# Altium PCB FSAE_Analog_to_CAN_Converter.PcbDoc
Units mm, origin at the board's own origin, x right, y up, seen from the top; angles counter-clockwise.
Board outline 152.4 x 101.6 mm, 20 copper layers (F.Cu, F.Mask, B.Cu, B.Mask, In1.Cu, F.SilkS, In2.Cu, B.SilkS, F.Adhes, B.Adhes, F.Paste, B.Paste, Dwgs.User, Cmts.User, Eco1.User, Eco2.User, Edge.Cuts, Margin, B.CrtYd, F.CrtYd); 32 components, 0 nets, 154 pads, 43 vias.
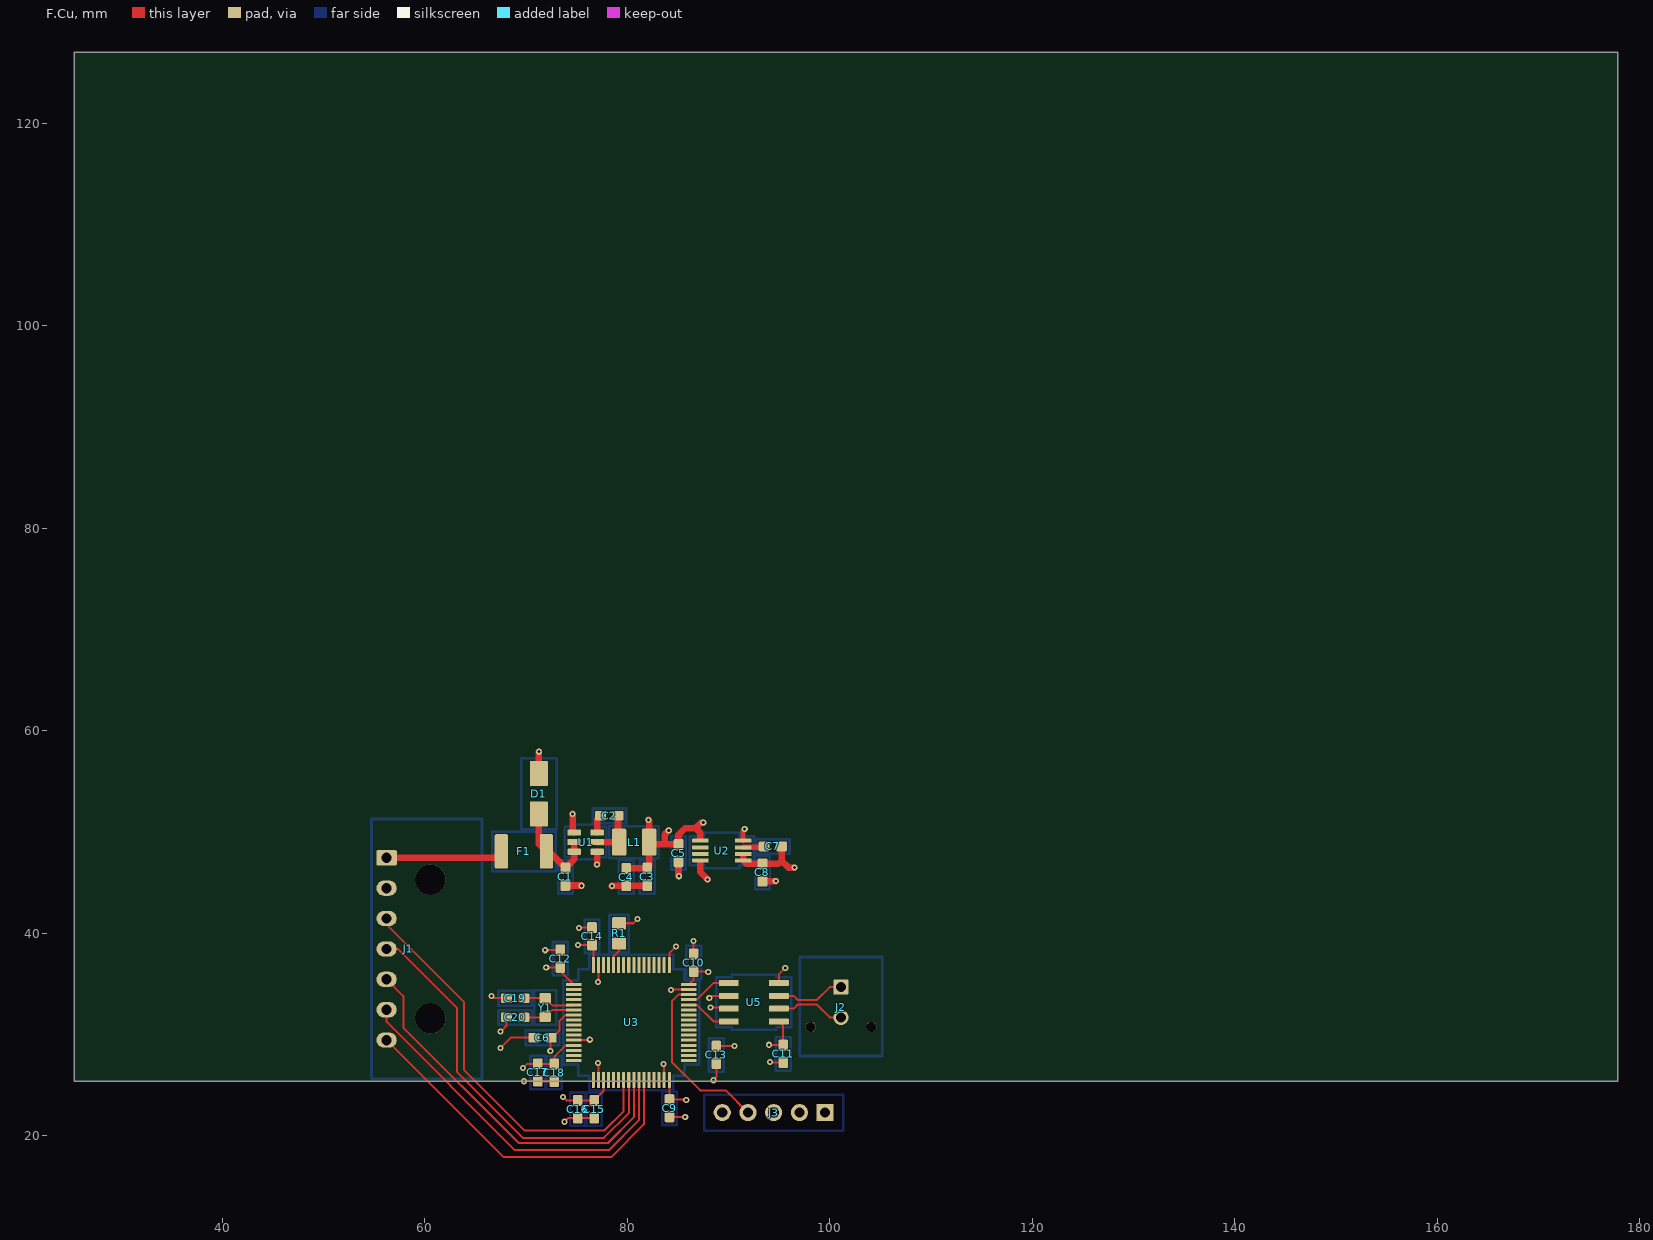
[diagram p0: F.Cu view]
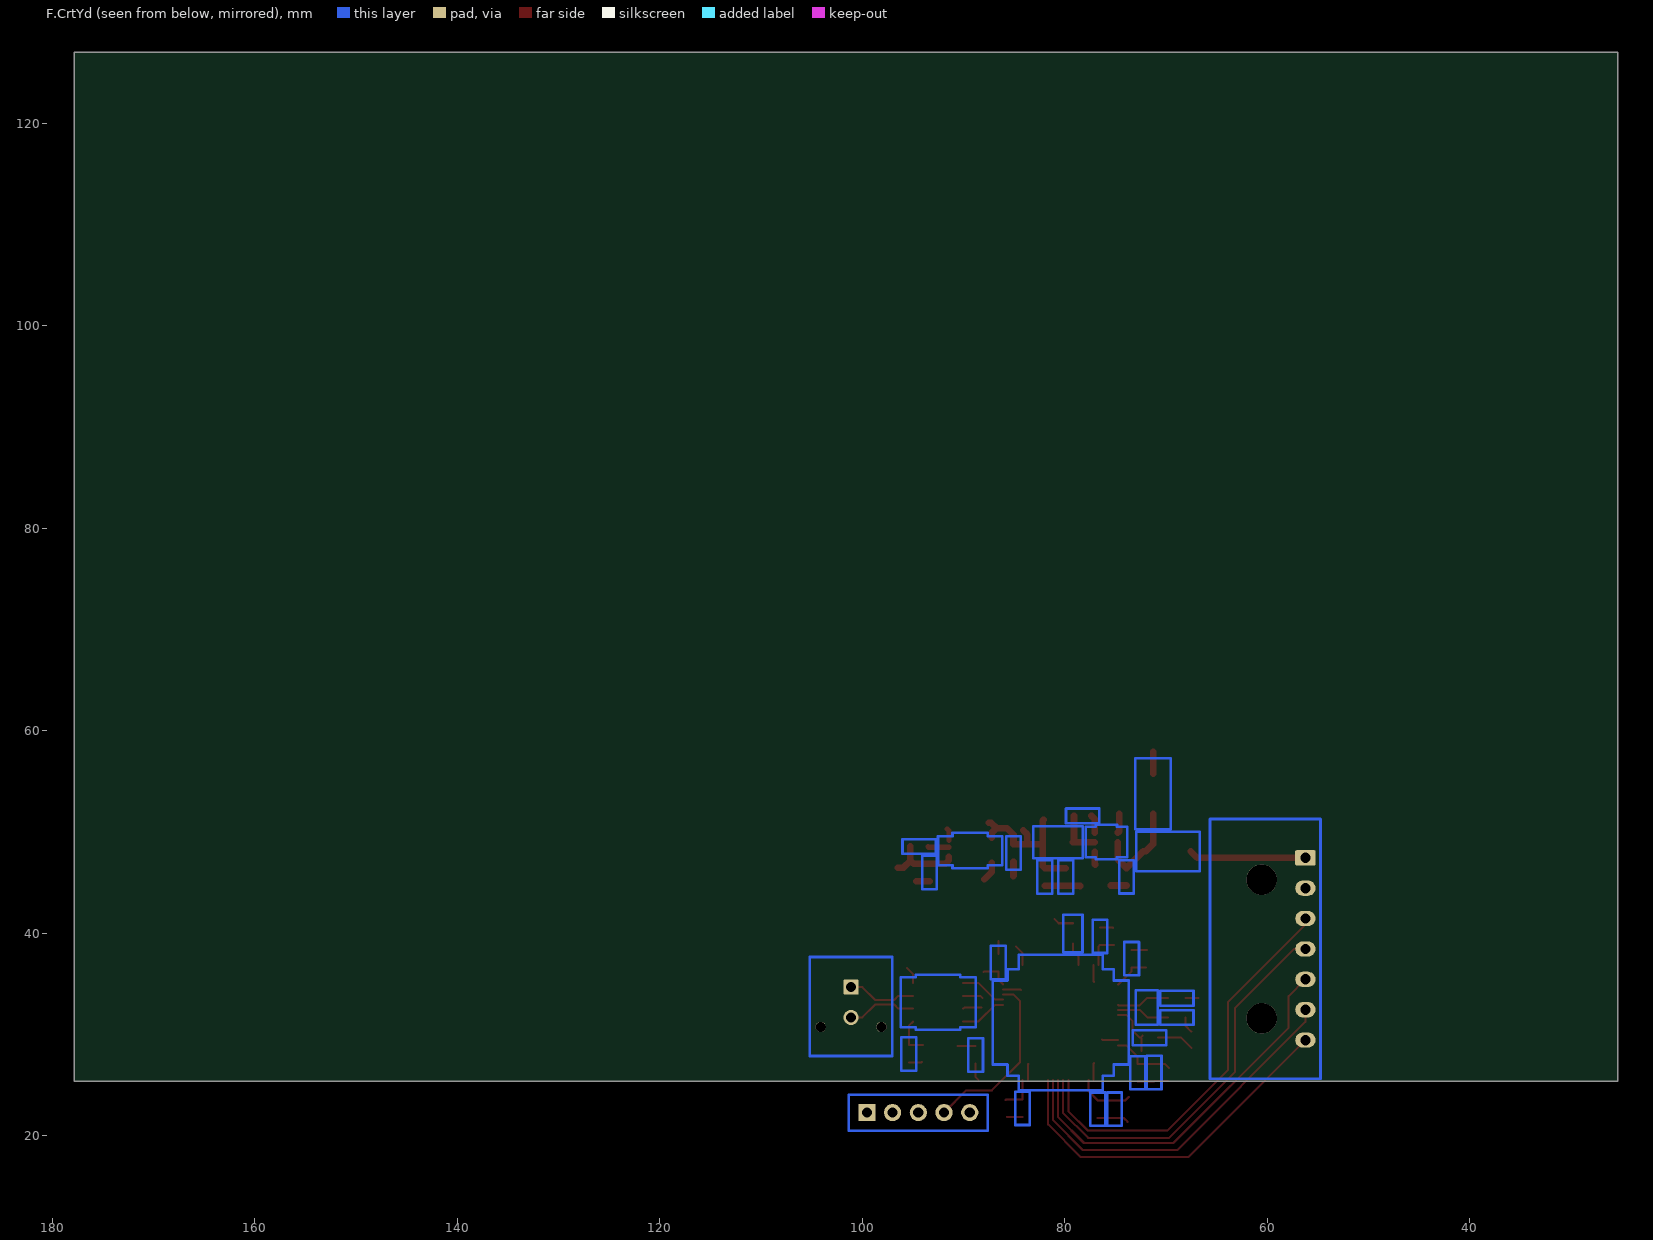
[diagram p1: F.CrtYd view, seen from below]
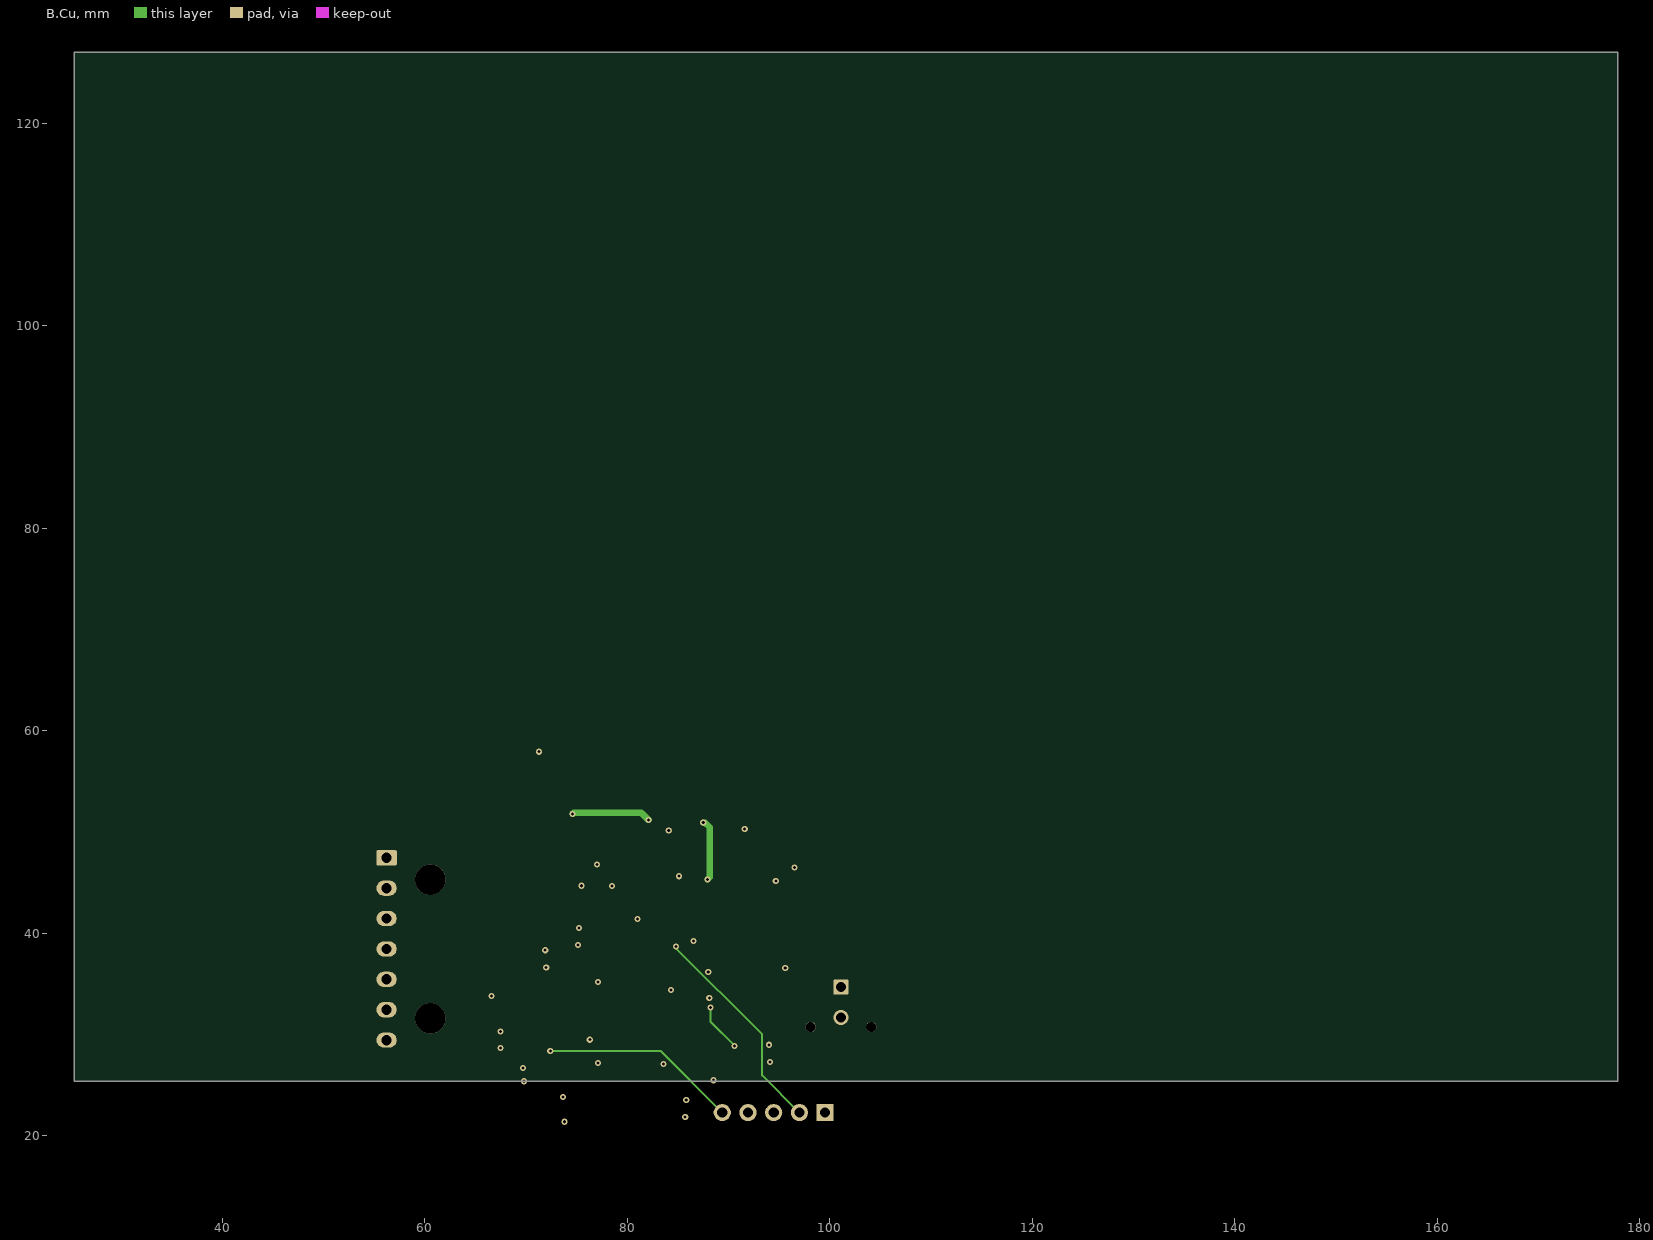
[diagram p2: B.Cu]
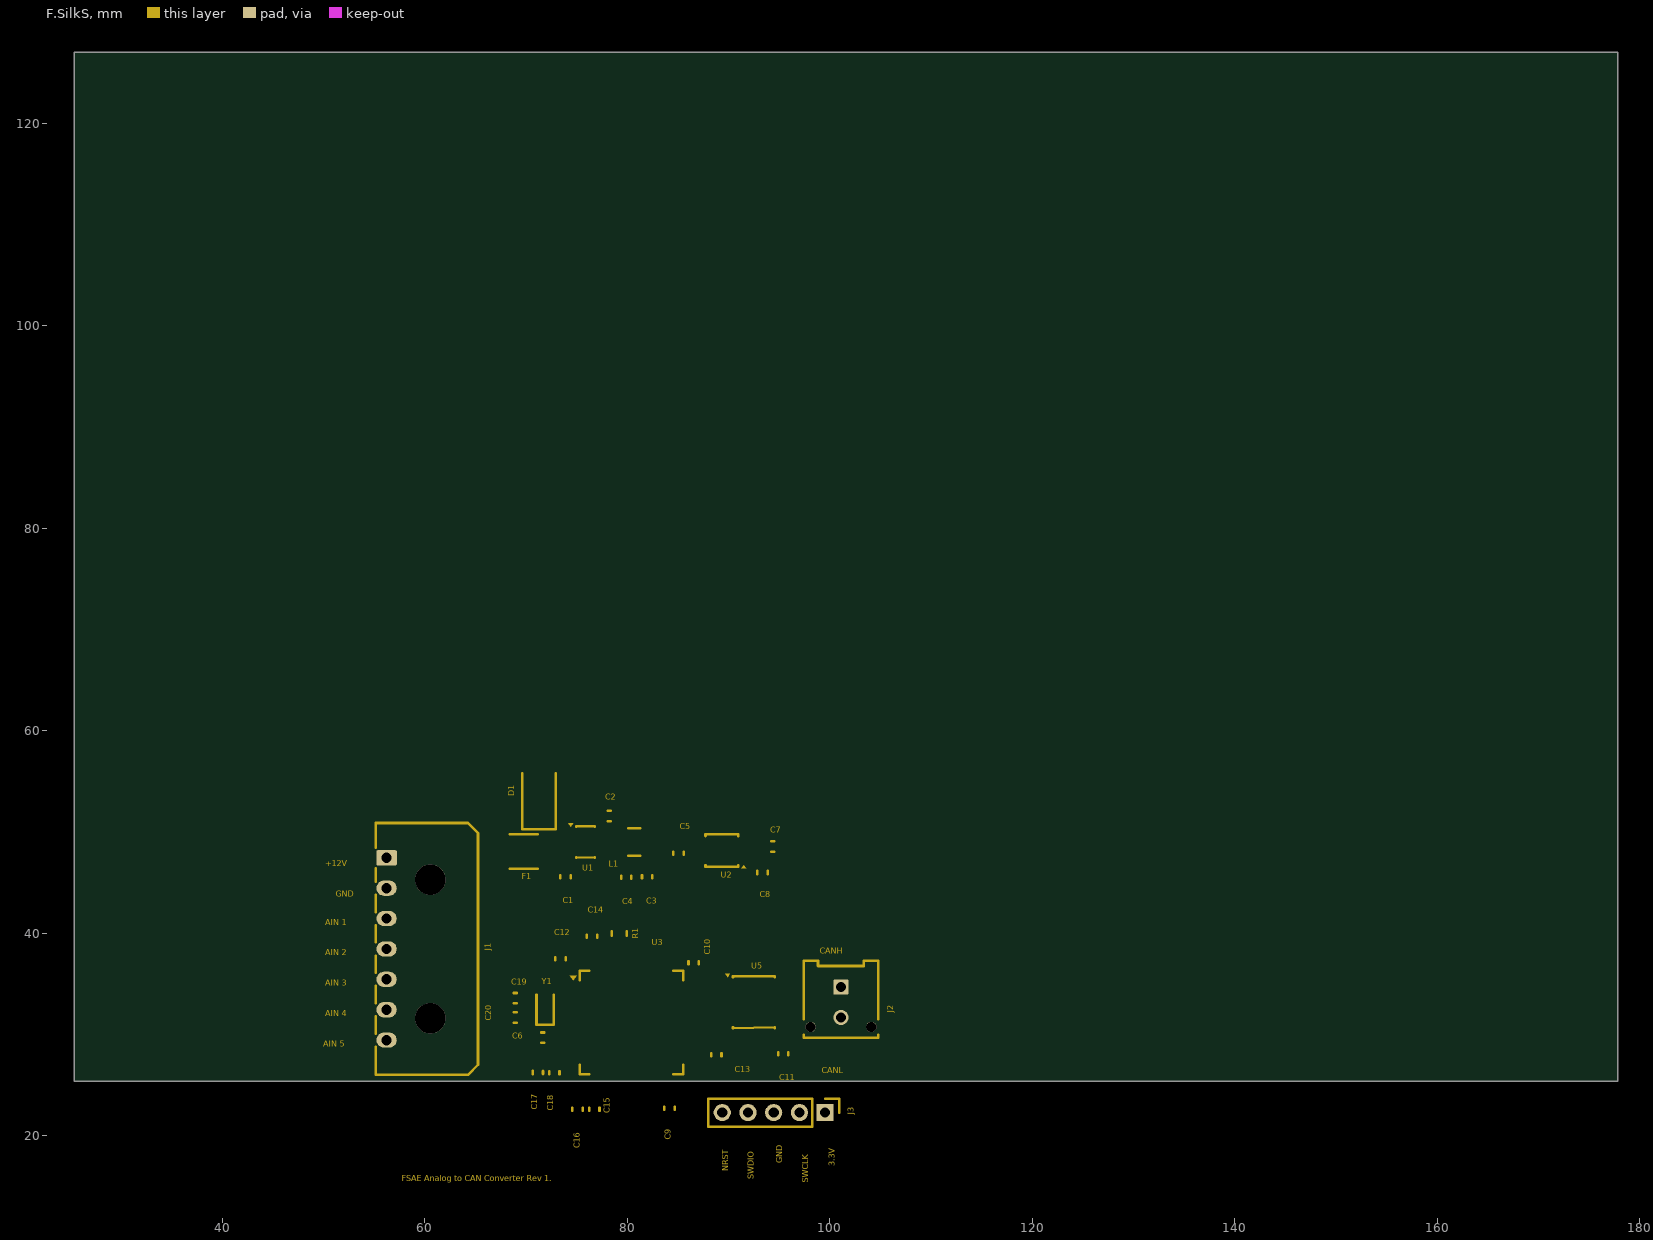
[diagram p3: F.SilkS]
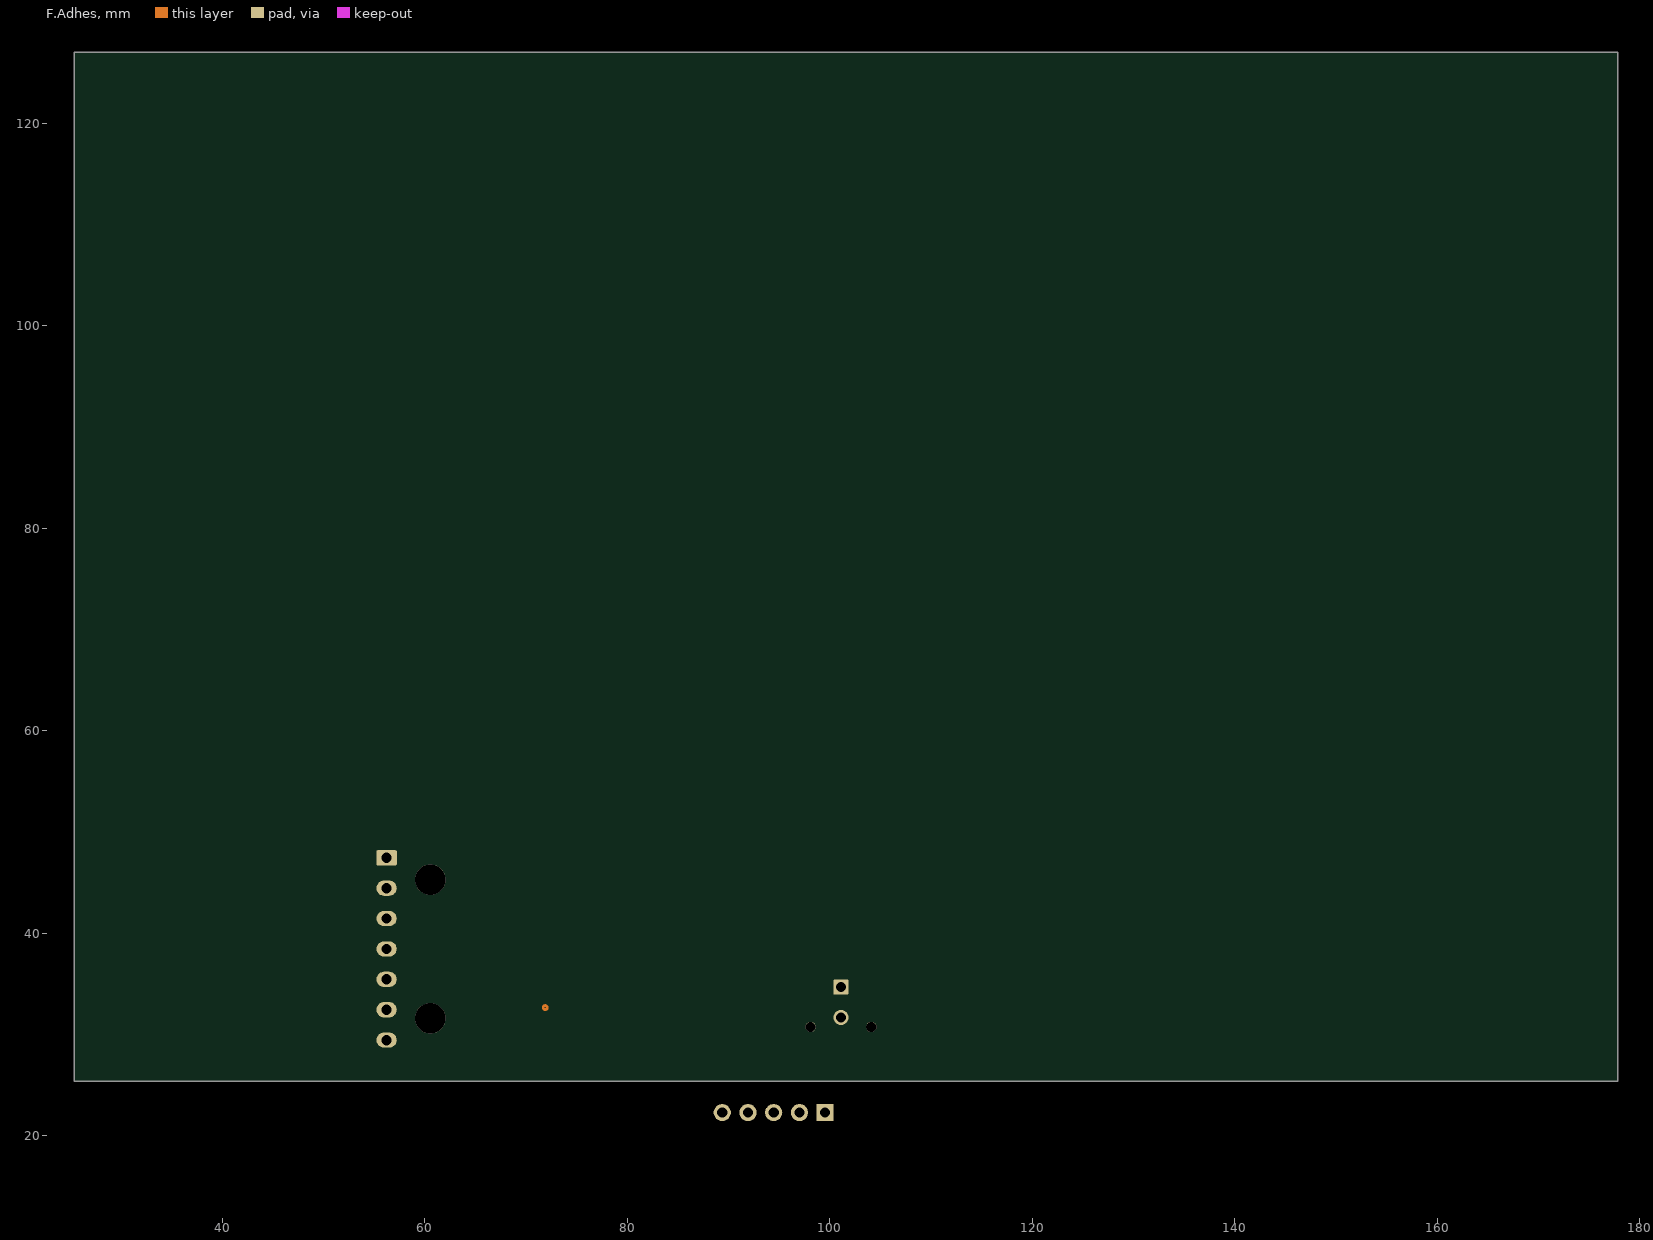
[diagram p4: F.Adhes]
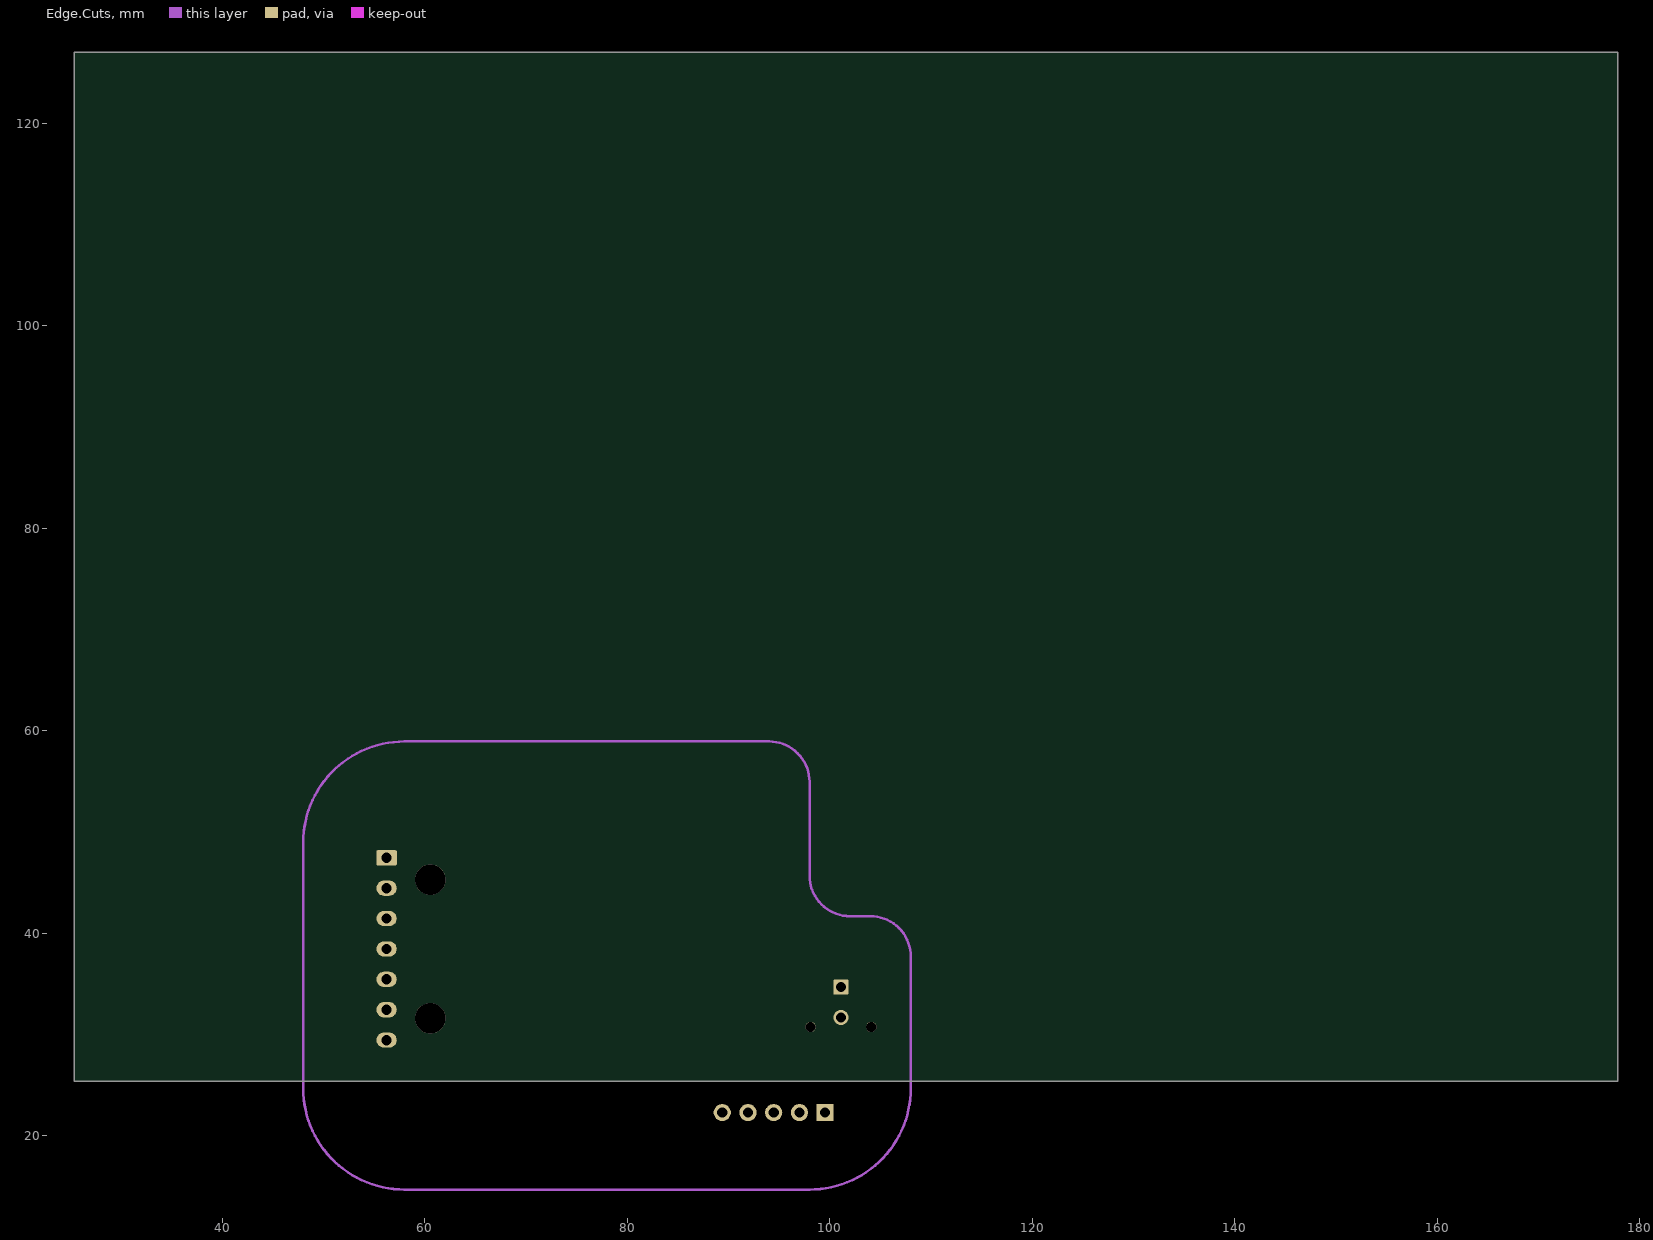
[diagram p5: Edge.Cuts]

## Layer stack, top to bottom
Top Solder: solder mask 0.0102, Solder Resist, Dk 3.5
F.Cu: signal copper 0.0356
Dielectric 1: dielectric 0.32, FR-4, Dk 4.8
F.Mask: signal copper 0.0356
Dielectric2: dielectric 0.32, FR-4, Dk 4.8
B.Cu: signal copper 0.0356
Dielectric3: dielectric 0.32, FR-4, Dk 4.8
B.Mask: signal copper 0.0356
Dielectric4: dielectric 0.32, FR-4, Dk 4.8
In1.Cu: signal copper 0.0356
Dielectric5: dielectric 0.32, FR-4, Dk 4.8
F.SilkS: signal copper 0.0356
Dielectric6: dielectric 0.32, FR-4, Dk 4.8
In2.Cu: signal copper 0.0356
Dielectric7: dielectric 0.32, FR-4, Dk 4.8
B.SilkS: signal copper 0.0356
Dielectric8: dielectric 0.32, FR-4, Dk 4.8
F.Adhes: signal copper 0.0356
Dielectric9: dielectric 0.32, FR-4, Dk 4.8
B.Adhes: signal copper 0.0356
Dielectric10: dielectric 0.32, FR-4, Dk 4.8
F.Paste: signal copper 0.0356
Dielectric11: dielectric 0.32, FR-4, Dk 4.8
B.Paste: signal copper 0.0356
Dielectric12: dielectric 0.32, FR-4, Dk 4.8
Dwgs.User: signal copper 0.0356
Dielectric13: dielectric 0.32, FR-4, Dk 4.8
Cmts.User: signal copper 0.0356
Dielectric14: dielectric 0.32, FR-4, Dk 4.8
Eco1.User: signal copper 0.0356
Dielectric15: dielectric 0.32, FR-4, Dk 4.8
Eco2.User: signal copper 0.0356
Dielectric16: dielectric 0.32, FR-4, Dk 4.8
Edge.Cuts: signal copper 0.0356
Dielectric17: dielectric 0.32, FR-4, Dk 4.8
Margin: signal copper 0.0356
Dielectric18: dielectric 0.32, FR-4, Dk 4.8
B.CrtYd: signal copper 0.0356
Dielectric19: dielectric 0.32, FR-4, Dk 4.8
F.CrtYd: signal copper 0.0356
Bottom Solder: solder mask 0.0102, Solder Resist, Dk 3.5

## Board outline
25.4,25.4 177.8,25.4 177.8,127 25.4,127

## Design rules (kind name [scope] priority, off if disabled: settings)
Clearance "Clearence 0.5_Polygon" [InNamedPolygon('In1.Cu-') OR InNamedPolygon('In2.Cu-') OR InNamedPolygon('In2.Cu--1')] p1: gap=0.5 ignorepadtopadclearanceinfootprint=FALSE
Clearance "Clearence 0.2_NetClass" [InNetClass('Default')] p2: gap=0.2 ignorepadtopadclearanceinfootprint=FALSE
MinimumSolderMaskSliver [All] p1: minsoldermaskwidth=0
PolygonConnect Polygon_In2.Cu--1_ConnectDirect [IsNamedPolygon('In2.Cu--1') vs IsVia] p1: connectstyle=Direct reliefconductorwidth=0.254 reliefentries=4 polygonreliefangle="90 Angle" airgapwidth=0.254
PolygonConnect Polygon_In2.Cu--1_ConnectRelief45 [IsNamedPolygon('In2.Cu--1') vs (IsThruPin or IsSMTPin) and (PadShape_AllLayers = 'Round')] p2: connectstyle=Relief reliefconductorwidth=0.5 reliefentries=4 polygonreliefangle="45 Angle" airgapwidth=0.5
PolygonConnect Polygon_In2.Cu--1_ConnectRelief90 [IsNamedPolygon('In2.Cu--1') vs (IsThruPin or IsSMTPin) and (PadShape_AllLayers <> 'Round')] p3: connectstyle=Relief reliefconductorwidth=0.5 reliefentries=4 polygonreliefangle="90 Angle" airgapwidth=0.5
PolygonConnect Polygon_In2.Cu-_ConnectDirect [IsNamedPolygon('In2.Cu-') vs IsVia] p4: connectstyle=Direct reliefconductorwidth=0.254 reliefentries=4 polygonreliefangle="90 Angle" airgapwidth=0.254
PolygonConnect Polygon_In2.Cu-_ConnectRelief45 [IsNamedPolygon('In2.Cu-') vs (IsThruPin or IsSMTPin) and (PadShape_AllLayers = 'Round')] p5: connectstyle=Relief reliefconductorwidth=0.5 reliefentries=4 polygonreliefangle="45 Angle" airgapwidth=0.5
PolygonConnect Polygon_In2.Cu-_ConnectRelief90 [IsNamedPolygon('In2.Cu-') vs (IsThruPin or IsSMTPin) and (PadShape_AllLayers <> 'Round')] p6: connectstyle=Relief reliefconductorwidth=0.5 reliefentries=4 polygonreliefangle="90 Angle" airgapwidth=0.5
PolygonConnect Polygon_In1.Cu-_ConnectDirect [IsNamedPolygon('In1.Cu-') vs IsVia] p7: connectstyle=Direct reliefconductorwidth=0.254 reliefentries=4 polygonreliefangle="90 Angle" airgapwidth=0.254
PolygonConnect Polygon_In1.Cu-_ConnectRelief45 [IsNamedPolygon('In1.Cu-') vs (IsThruPin or IsSMTPin) and (PadShape_AllLayers = 'Round')] p8: connectstyle=Relief reliefconductorwidth=0.5 reliefentries=4 polygonreliefangle="45 Angle" airgapwidth=0.5
PolygonConnect Polygon_In1.Cu-_ConnectRelief90 [IsNamedPolygon('In1.Cu-') vs (IsThruPin or IsSMTPin) and (PadShape_AllLayers <> 'Round')] p9: connectstyle=Relief reliefconductorwidth=0.5 reliefentries=4 polygonreliefangle="90 Angle" airgapwidth=0.5
RoutingVias [All] p1: holewidth=0.711 width=1.27 viastyle="Through Hole" minholewidth=0.711 minwidth=1.27 maxholewidth=0.711 maxwidth=1.27
SilkToSilkClearance [All] p1: silktosilkclearance=0
SilkToSolderMaskClearance [IsPad] p1: minsilkscreentomaskgap=0 clearancetoexposedcopper=TRUE
SolderMaskExpansion [All] p1: expansion=0 istentingtop=FALSE
Width [All] p1: maxlimit=10 minlimit=0.254 preferedwidth=0.254 toplayer_prefwidth=0.2 midlayer1_maxwidth=0.254 midlayer2_prefwidth=0.2 midlayer3_maxwidth=0.254 midlayer4_prefwidth=0.2 midlayer5_prefwidth=0.2 midlayer6_prefwidth=0.2 midlayer7_maxwidth=0.254 midlayer9_prefwidth=0.2 midlayer11_maxwidth=0.254 midlayer13_maxwidth=0.254 midlayer15_maxwidth=0.254 midlayer17_maxwidth=0.254 midlayer19_maxwidth=0.254 midlayer21_maxwidth=0.254 midlayer23_maxwidth=0.254 midlayer25_prefwidth=0.2 midlayer27_maxwidth=0.254 midlayer29_maxwidth=0.254 bottomlayer_prefwidth=0.2 minimp=50.000000 maximp=50.000000 favimp=50.000000
27 further rules are at their usual default settings.

## Components (designator, comment, footprint, x,y, rotation, side; value= is the part's Value field where it differs from the comment)
C1 "Comment" C_0603_1608Metric_Pad1.08x0.95mm_HandSolder 73.9,45.587 r270 top value=10uF
C2 "Comment" C_0603_1608Metric_Pad1.08x0.95mm_HandSolder 78.225,51.602 r180 top value=100nF
C3 "Comment" C_0603_1608Metric_Pad1.08x0.95mm_HandSolder 81.97,45.582 r270 top value=22uF
C4 "Comment" C_0603_1608Metric_Pad1.08x0.95mm_HandSolder 79.9,45.562 r270 top value=22uF
C5 "Comment" C_0603_1608Metric_Pad1.08x0.95mm_HandSolder 85.065,47.929 r270 top value=1uF
C6 "Comment" C_0603_1608Metric_Pad1.08x0.95mm_HandSolder 71.637,29.7 r0 top value=0.1uF
C7 "Comment" C_0603_1608Metric_Pad1.08x0.95mm_HandSolder 94.375,48.582 r0 top value=0.01uF
C8 "Comment" C_0603_1608Metric_Pad1.08x0.95mm_HandSolder 93.355,46.012 r90 top value=10uF
C9 "Comment" C_0603_1608Metric_Pad1.08x0.95mm_HandSolder 84.173,22.73 r270 top value=100nF
C10 "Comment" C_0603_1608Metric_Pad1.08x0.95mm_HandSolder 86.56,37.108 r90 top value=100nF
C11 "Comment" C_0603_1608Metric_Pad1.08x0.95mm_HandSolder 95.4,28.1 r90 top value=100nF
C12 "Comment" C_0603_1608Metric_Pad1.08x0.95mm_HandSolder 73.4,37.5 r90 top value=100nF
C13 "Comment" C_0603_1608Metric_Pad1.08x0.95mm_HandSolder 88.8,28 r90 top value=100nF
C14 "Comment" C_0603_1608Metric_Pad1.08x0.95mm_HandSolder 76.525,39.712 r90 top value=100nF
C15 "Comment" C_0603_1608Metric_Pad1.08x0.95mm_HandSolder 76.751,22.637 r270 top value=100nF
C16 "Comment" C_0603_1608Metric_Pad1.08x0.95mm_HandSolder 75.1,22.635 r270 top value=4.7uF
C17 "Comment" C_0603_1608Metric_Pad1.08x0.95mm_HandSolder 71.174,26.262 r270 top value=10nF
C18 "Comment" C_0603_1608Metric_Pad1.08x0.95mm_HandSolder 72.8,26.237 r270 top value=1uF
C19 "Comment" C_0603_1608Metric_Pad1.08x0.95mm_HandSolder 68.937,33.6 r0 top value=10pF
C20 "Comment" C_0603_1608Metric_Pad1.08x0.95mm_HandSolder 68.937,31.7 r0 top value=10pF
D1 "Comment" D_SMA 71.28,53.79 r90 top value=SMAJ16A
F1 "Comment" Fuse_1812_4532Metric_Pad1.30x3.40mm_HandSolder 69.79,48.09 r180 top value=Polyfuse
J1 "Comment" Molex_Micro-Fit_3.0_43650-0700_1x07_P3.00mm_Horizontal 56.236,47.462 r270 top value=Conn_01x07_Pin
J2 "Comment" Molex_Micro-Fit_3.0_43045-0212_2x01_P3.00mm_Vertical 101.1,34.7 r0 top value=Conn_01x02_Pin
J3 "Comment" PinHeader_1x05_P2.54mm_Vertical 99.54,22.3 r270 top value=Conn_01x05
L1 "Comment" L_1210_3225Metric_Pad1.42x2.65mm_HandSolder 80.68,49.01 r0 top value=10uH
R1 "Comment" R_0805_2012Metric_Pad1.20x1.40mm_HandSolder 79.2,40 r90 top value=10k
U1 "Comment" TSOT-23-6 75.888,49.01 r0 top value=AP63205WU
U2 "Comment" MSOP-8_3x3mm_P0.65mm 89.337,48.177 r180 top value=LT1962-3.3
U3 "Comment" LQFP-64_10x10mm_P0.5mm 80.4,31.2 r0 top value=STM32F103RCTx
U5 "Comment" SOIC-8_3.9x4.9mm_P1.27mm 92.5,33.2 r0 top value=MCP2562-E-SN
Y1 "Comment" Crystal_SMD_2012-2Pin_2.0x1.2mm_HandSoldering 71.9,32.675 r90 top value=8MHz

## Footprints (in the part's own frame and the unit in brackets; to place one, negate y for a bottom-side part, rotate by r counter-clockwise, add the part's x,y. Pads: shape width x height; smd on the part's side, far side on the other; paste and mask are expansions set on the pad)
C_0603_1608Metric_Pad1.08x0.95mm_HandSolder [mm]
  rrect25% 1.075x0.95 smd paste-1.075 mask-1.075: 1(-0.863,0) 2(0.863,0)
  F.SilkS lines w0.254: 0.146,-0.51 -0.146,-0.51 ; 0.146,0.51 -0.146,0.51
  F.CrtYd lines w0.254: 1.65,-0.73 1.65,0.73 -1.65,0.73 -1.65,-0.73 1.65,-0.73
Crystal_SMD_2012-2Pin_2.0x1.2mm_HandSoldering [mm]
  rrect24% 1.05x1.1 smd paste-1.1 mask-1.1: 1(-0.925,0) 2(0.925,0)
  F.SilkS lines w0.254: 1.26,0.86 -1.71,0.86 -1.71,-0.86 1.26,-0.86
  F.Adhes circle w0.254: c0,0 r0.2
  F.CrtYd lines w0.254: -1.71,1.1 1.71,1.1 1.71,-1.1 -1.71,-1.1 -1.71,1.1
D_SMA [mm]
  rrect14% 2.5x1.8 smd paste-2.5 mask-2.5: 1(-2,0) 2(2,0)
  F.SilkS lines w0.254: 2,1.65 -3.51,1.65 -3.51,-1.65 2,-1.65
  F.CrtYd lines w0.254: -3.5,1.75 -3.5,-1.75 3.5,-1.75 3.5,1.75 -3.5,1.75
Fuse_1812_4532Metric_Pad1.30x3.40mm_HandSolder [mm]
  rrect19% 1.3x3.4 smd paste-3.4 mask-3.4: 1(-2.225,0) 2(2.225,0)
  F.SilkS lines w0.254: 1.386,1.71 -1.386,1.71 ; 1.386,-1.71 -1.386,-1.71
  F.CrtYd lines w0.254: 3.13,1.95 -3.13,1.95 -3.13,-1.95 3.13,-1.95 3.13,1.95
L_1210_3225Metric_Pad1.42x2.65mm_HandSolder [mm]
  rrect18% 1.425x2.65 smd paste-2.65 mask-2.65: 1(-1.488,0) 2(1.488,0)
  F.SilkS lines w0.254: -0.602,-1.36 0.602,-1.36 ; -0.602,1.36 0.602,1.36
  F.CrtYd lines w0.254: -2.45,-1.58 2.45,-1.58 2.45,1.58 -2.45,1.58 -2.45,-1.58
LQFP-64_10x10mm_P0.5mm [mm]
  rrect25% 1.55x0.3 smd paste-1.55 mask-1.55: 1(-5.675,3.75) 2(-5.675,3.25) 3(-5.675,2.75) 4(-5.675,2.25) 5(-5.675,1.75) 6(-5.675,1.25) 7(-5.675,0.75) 8(-5.675,0.25) 9(-5.675,-0.25) 10(-5.675,-0.75) 11(-5.675,-1.25) 12(-5.675,-1.75) 13(-5.675,-2.25) 14(-5.675,-2.75) 15(-5.675,-3.25) 16(-5.675,-3.75) 33(5.675,-3.75) 34(5.675,-3.25) 35(5.675,-2.75) 36(5.675,-2.25) 37(5.675,-1.75) 38(5.675,-1.25) 39(5.675,-0.75) 40(5.675,-0.25) 41(5.675,0.25) 42(5.675,0.75) 43(5.675,1.25) 44(5.675,1.75) 45(5.675,2.25) 46(5.675,2.75) 47(5.675,3.25) 48(5.675,3.75)
  rrect25% 0.3x1.55 smd paste-1.55 mask-1.55: 17(-3.75,-5.675) 18(-3.25,-5.675) 19(-2.75,-5.675) 20(-2.25,-5.675) 21(-1.75,-5.675) 22(-1.25,-5.675) 23(-0.75,-5.675) 24(-0.25,-5.675) 25(0.25,-5.675) 26(0.75,-5.675) 27(1.25,-5.675) 28(1.75,-5.675) 29(2.25,-5.675) 30(2.75,-5.675) 31(3.25,-5.675) 32(3.75,-5.675) 49(3.75,5.675) 50(3.25,5.675) 51(2.75,5.675) 52(2.25,5.675) 53(1.75,5.675) 54(1.25,5.675) 55(0.75,5.675) 56(0.25,5.675) 57(-0.25,5.675) 58(-0.75,5.675) 59(-1.25,5.675) 60(-1.75,5.675) 61(-2.25,5.675) 62(-2.75,5.675) 63(-3.25,5.675) 64(-3.75,5.675)
  F.SilkS region: -5.75,4.16 -6.09,4.63 -5.41,4.63
  F.SilkS lines w0.254: -5.11,-4.16 -5.11,-5.11 -4.16,-5.11 ; -5.11,4.16 -5.11,5.11 -4.16,5.11 ; 4.16,-5.11 5.11,-5.11 5.11,-4.16 ; 4.16,5.11 5.11,5.11 5.11,4.16
  F.CrtYd lines w0.254: -6.7,-4.15 -6.7,4.15 -5.25,4.15 -5.25,5.25 -4.15,5.25 -4.15,6.7 4.15,6.7 4.15,5.25 5.25,5.25 5.25,4.15 6.7,4.15 6.7,-4.15 5.25,-4.15 5.25,-5.25 4.15,-5.25 4.15,-6.7 -4.15,-6.7 -4.15,-5.25 -5.25,-5.25 -5.25,-4.15 -6.7,-4.15
Molex_Micro-Fit_3.0_43045-0212_2x01_P3.00mm_Vertical [mm]
  rrect17% 1.5x1.5 hole 1.02 paste-2539.97 mask-1.5: 1(0,0)
  round 1.5 hole 1.02 paste-2539.97 mask-1.5: 2(0,-3)
  round 1.02 hole 1.02 paste-2539.97 mask-1.02: Un1(-3,-3.94) Un2(3,-3.94)
  F.SilkS lines w0.254: -3.685,-4.71 -3.685,-5.01 3.685,-5.01 3.685,-4.71 ; -3.685,-3.17 -3.685,2.58 -2.265,2.58 -2.265,2.08 2.265,2.08 2.265,2.58 3.685,2.58 3.685,-3.17
  F.CrtYd lines w0.254: -4.08,-6.81 4.08,-6.81 4.08,2.97 -4.08,2.97 -4.08,-6.81
Molex_Micro-Fit_3.0_43650-0700_1x07_P3.00mm_Horizontal [mm]
  rrect17% 1.5x2.02 hole 1.02 paste-2539.97 mask-2.02: 1(0,0)
  rrect100% 1.5x2.02 hole 1.02 paste-2539.97 mask-2.02: 2(3,0) 3(6,0) 4(9,0) 5(12,0) 6(15,0) 7(18,0)
  round 3 hole 3 paste-2539.97 mask-3: Un1(2.15,4.32) Un2(15.85,4.32)
  F.SilkS lines w0.254: 18.652,-1.09 21.435,-1.09 21.435,8.03 20.435,9.03 -2.435,9.03 -3.435,8.03 -3.435,-1.09 -1.01,-1.09 ; 17.348,-1.09 15.652,-1.09 ; 14.348,-1.09 12.652,-1.09 ; 11.348,-1.09 9.652,-1.09 ; 8.348,-1.09 6.652,-1.09 ; 5.348,-1.09 3.652,-1.09 ; 2.348,-1.09 1.01,-1.09
  F.CrtYd lines w0.254: 21.83,-1.49 21.83,9.42 -3.83,9.42 -3.83,-1.49 21.83,-1.49
MSOP-8_3x3mm_P0.65mm [mm]
  rrect25% 1.625x0.4 smd paste-1.625 mask-1.625: 1(-2.113,0.975) 2(-2.113,0.325) 3(-2.113,-0.325) 4(-2.113,-0.975) 5(2.113,-0.975) 6(2.113,-0.325) 7(2.113,0.325) 8(2.113,0.975)
  F.SilkS region: -2.16,1.44 -2.4,1.77 -1.92,1.77
  F.SilkS lines w0.254: 1.61,1.435 1.61,1.61 -1.61,1.61 -1.61,1.435 ; 1.61,-1.435 1.61,-1.61 -1.61,-1.61 -1.61,-1.435
  F.CrtYd lines w0.254: 3.18,1.43 3.18,-1.43 1.75,-1.43 1.75,-1.75 -1.75,-1.75 -1.75,-1.43 -3.18,-1.43 -3.18,1.43 -1.75,1.43 -1.75,1.75 1.75,1.75 1.75,1.43 3.18,1.43
PinHeader_1x05_P2.54mm_Vertical [mm]
  rect 1.7x1.7 hole 1 paste-2539.97 mask-1.7: 1(0,0)
  round 1.7 hole 1 paste-2539.97 mask-1.7: 2(0,-2.54) 3(0,-5.08) 4(0,-7.62) 5(0,-10.16)
  F.SilkS lines w0.254: -1.38,0 -1.38,1.38 0,1.38 ; 1.38,-11.54 1.38,-1.27 -1.38,-1.27 -1.38,-11.54 1.38,-11.54
  F.CrtYd lines w0.254: 1.77,-11.93 1.77,1.77 -1.77,1.77 -1.77,-11.93 1.77,-11.93
R_0805_2012Metric_Pad1.20x1.40mm_HandSolder [mm]
  rrect21% 1.2x1.4 smd paste-1.4 mask-1.4: 1(-1,0) 2(1,0)
  F.SilkS lines w0.254: -0.227,0.735 0.227,0.735 ; -0.227,-0.735 0.227,-0.735
  F.CrtYd lines w0.254: -1.85,0.95 1.85,0.95 1.85,-0.95 -1.85,-0.95 -1.85,0.95
SOIC-8_3.9x4.9mm_P1.27mm [mm]
  rrect25% 1.95x0.6 smd paste-1.95 mask-1.95: 1(-2.475,1.905) 2(-2.475,0.635) 3(-2.475,-0.635) 4(-2.475,-1.905) 5(2.475,-1.905) 6(2.475,-0.635) 7(2.475,0.635) 8(2.475,1.905)
  F.SilkS region: -2.6,2.47 -2.84,2.8 -2.36,2.8
  F.SilkS lines w0.254: -2.06,-2.465 -2.06,-2.56 2.06,-2.465 2.06,-2.56 ; -2.06,2.465 -2.06,2.56 2.06,2.56 2.06,2.465
  F.CrtYd lines w0.254: -3.7,-2.46 -3.7,2.46 -2.2,2.46 -2.2,2.7 2.2,2.7 2.2,2.46 3.7,2.46 3.7,-2.46 2.2,-2.46 2.2,-2.7 -2.2,-2.7 -2.2,-2.46 -3.7,-2.46
TSOT-23-6 [mm]
  rrect25% 1.325x0.6 smd paste-1.325 mask-1.325: 1(-1.138,0.95) 2(-1.138,0) 3(-1.138,-0.95) 4(1.138,-0.95) 5(1.138,0) 6(1.138,0.95)
  F.SilkS region: -1.45,1.51 -1.69,1.84 -1.21,1.84
  F.SilkS lines w0.254: -0.91,-1.51 -0.91,-1.56 0.91,-1.51 0.91,-1.56 ; -0.91,1.51 -0.91,1.56 0.91,1.56 0.91,1.51
  F.CrtYd lines w0.254: -2.05,-1.5 -2.05,1.5 -1.05,1.5 -1.05,1.7 1.05,1.7 1.05,1.5 2.05,1.5 2.05,-1.5 1.05,-1.5 1.05,-1.7 -1.05,-1.7 -1.05,-1.5 -2.05,-1.5

## Part data
C1 C2 C3 C4 C5 C6 C7 C8 C9 C10 C11 C12 C13 C14 C15 C16 C17 C18 C19 C20: library part C_0603_1608Metric_Pad1.08x0.95mm_HandSolder, "Capacitor SMD 0603 (1608 Metric), square (rectangular) end terminal, IPC-7351 nominal with elongated pad for handsoldering. (Body size source: IPC-SM-782 page 76, https://www.pcb-3d.com/wordpress/wp-content/uploads/ipc-sm-782a_amendment_1_and_2.pdf)", Description="Unpolarized capacitor", KiLib_Generator=SMD_2terminal_chip_molded, ki_fp_filters=C_*
D1: library part D_SMA, "Diode SMA (DO-214AC)", Datasheet=https://www.littelfuse.com/media?resourcetype=datasheets&itemid=75e32973-b177-4ee3-a0ff-cedaf1abdb93&filename=smaj-datasheet, Description="400W unidirectional Transient Voltage Suppressor, 16.0Vr, SMA(DO-214AC)", ki_fp_filters=D*SMA*
F1: library part Fuse_1812_4532Metric_Pad1.30x3.40mm_HandSolder, "Fuse SMD 1812 (4532 Metric), square (rectangular) end terminal, IPC-7351 nominal with elongated pad for handsoldering. (Body size source: https://www.nikhef.nl/pub/departments/mt/projects/detectorR_D/dtddice/ERJ2G.pdf)", Description="Resettable fuse, polymeric positive temperature coefficient", KiLib_Generator=SMD_2terminal_chip_molded, ki_fp_filters="*polyfuse* *PTC*"
J1: library part Molex_Micro-Fit_3.0_43650-0700_1x07_P3.00mm_Horizontal, "Molex Micro-Fit 3.0 Connector System, 43650-0700 (compatible alternatives: 43650-0701, 43650-0702), 7 Pins per row (https://www.molex.com/pdm_docs/sd/436500300_sd.pdf)", Description="Generic connector, single row, 01x07, script generated", KiLib_Generator=connector/Molex, ki_fp_filters=Connector*:*_1x??_*
J2: library part Molex_Micro-Fit_3.0_43045-0212_2x01_P3.00mm_Vertical, "Molex Micro-Fit 3.0 Connector System, 43045-0212 (compatible alternatives: 43045-0213, 43045-0214), 1 Pins per row (http://www.molex.com/pdm_docs/sd/430450212_sd.pdf)", Description="Generic connector, single row, 01x02, script generated", KiLib_Generator=connector/Molex, ki_fp_filters=Connector*:*_1x??_*
J3: library part PinHeader_1x05_P2.54mm_Vertical, "Through hole straight pin header, 1x05, 2.54mm pitch, single row", Description="Generic connector, single row, 01x05, script generated (kicad-library-utils/schlib/autogen/connector/)", KiLib_Generator=connector/pin_header_socket, ki_fp_filters=Connector*:*_1x??_*
L1: library part L_1210_3225Metric_Pad1.42x2.65mm_HandSolder, "Inductor SMD 1210 (3225 Metric), square (rectangular) end terminal, IPC-7351 nominal with elongated pad for handsoldering. (Body size source: http://www.tortai-tech.com/upload/download/2011102023233369053.pdf)", Description=Inductor, KiLib_Generator=SMD_2terminal_chip_molded, ki_fp_filters="Choke_* *Coil* Inductor_* L_*"
R1: library part R_0805_2012Metric_Pad1.20x1.40mm_HandSolder, "Resistor SMD 0805 (2012 Metric), square (rectangular) end terminal, IPC-7351 nominal with elongated pad for handsoldering. (Body size source: IPC-SM-782 page 72, https://www.pcb-3d.com/wordpress/wp-content/uploads/ipc-sm-782a_amendment_1_and_2.pdf)", Description=Resistor, KiLib_Generator=SMD_2terminal_chip_molded, ki_fp_filters=R_*
U1: library part TSOT-23-6, "TSOT, 6 Pin (https://www.jedec.org/sites/default/files/docs/MO-193D.pdf variant AA)", Datasheet=https://www.diodes.com/assets/Datasheets/AP63200-AP63201-AP63203-AP63205.pdf, Description="2A, 1.1MHz Buck DC/DC Converter, fixed 5.0V output voltage, TSOT-23-6", KiLib_Generator=package/gullwing, ki_fp_filters=TSOT?23*
U2: library part MSOP-8_3x3mm_P0.65mm, "MSOP, 8 Pin (https://www.jedec.org/system/files/docs/mo-187F.pdf variant AA)", Datasheet=https://www.analog.com/media/en/technical-documentation/data-sheets/1962fb.pdf, Description="3.3V, 300mA, Low Noise, Micropower LDO Regulator, MSOP-8", KiLib_Generator=package/gullwing, ki_fp_filters=MSOP*3x3mm*P0.65mm*
U3: library part LQFP-64_10x10mm_P0.5mm, "LQFP, 64 Pin (https://www.analog.com/media/en/technical-documentation/data-sheets/ad7606_7606-6_7606-4.pdf)", Datasheet=https://www.st.com/resource/en/datasheet/stm32f103rc.pdf, Description="STMicroelectronics Arm Cortex-M3 MCU, 256KB flash, 48KB RAM, 72 MHz, 2.0-3.6V, 51 GPIO, LQFP64", KiLib_Generator=package/gullwing, ki_fp_filters=LQFP*10x10mm*P0.5mm*
U5: library part SOIC-8_3.9x4.9mm_P1.27mm, "SOIC, 8 Pin (JEDEC MS-012AA, https://www.analog.com/media/en/package-pcb-resources/package/pkg_pdf/soic_narrow-r/r_8.pdf)", Datasheet=http://ww1.microchip.com/downloads/en/DeviceDoc/25167A.pdf, Description="High-Speed CAN Transceiver, 1Mbps, 5V supply, Vio pin, -40C to +125C, SOIC-8", KiLib_Generator=package/gullwing, ki_fp_filters=SOIC*3.9x4.9mm*P1.27mm*
Y1: library part Crystal_SMD_2012-2Pin_2.0x1.2mm_HandSoldering, "2012/2, Crystal, 2.0x1.2mm package, SMD, hand-soldering, http://txccrystal.com/images/pdf/9ht11.pdf", Description="Two pin crystal", KiLib_Generator=crystal_resonator_oscillator, ki_fp_filters=Crystal*

## Via types
v1: diameter 0.6, hole 0.3, F.Cu to B.Cu, tented both sides, 43 vias

## Nets (pads, with @x,y where several pads share a name; then routed paths per layer and width w, separated by ;. In a path a pad name is that pad's centre, name@x,y a point inside that pad or via, vN(x,y) a via of type N, cw(c..) or ccw(c..) an arc to the next point about the centre after c; other vN are vias at no path point)
pads on no net: C1.1 C1.2 C2.1 C2.2 C3.1 C3.2 C4.1 C4.2 C5.1 C5.2 C6.1 C6.2 C7.1 C7.2 C8.1 C8.2 C9.1 C9.2 C10.1 C10.2 C11.1 C11.2 C12.1 C12.2 C13.1 C13.2 C14.1 C14.2 C15.1 C15.2 C16.1 C16.2 C17.1 C17.2 C18.1 C18.2 C19.1 C19.2 C20.1 C20.2 D1.1 D1.2 F1.1 F1.2 J1.1 J1.2 J1.3 J1.4 J1.5 J1.6 J1.7 J1.Un1 J1.Un2 J2.1 J2.2 J2.Un1 J2.Un2 J3.1 J3.2 J3.3 J3.4 J3.5 L1.1 L1.2 R1.1 R1.2 U1.1 U1.2 U1.3 U1.4 U1.5 U1.6 U2.1 U2.2 U2.3 U2.4 U2.5 U2.6 U2.7 U2.8 U3.1 U3.2 U3.3 U3.4 U3.5 U3.6 U3.7 U3.8 U3.9 U3.10 U3.11 U3.12 U3.13 U3.14 U3.15 U3.16 U3.17 U3.18 U3.19 U3.20 U3.21 U3.22 U3.23 U3.24 U3.25 U3.26 U3.27 U3.28 U3.29 U3.30 U3.31 U3.32 U3.33 U3.34 U3.35 U3.36 U3.37 U3.38 U3.39 U3.40 U3.41 U3.42 U3.43 U3.44 U3.45 U3.46 U3.47 U3.48 U3.49 U3.50 U3.51 U3.52 U3.53 U3.54 U3.55 U3.56 U3.57 U3.58 U3.59 U3.60 U3.61 U3.62 U3.63 U3.64 U5.1 U5.2 U5.3 U5.4 U5.5 U5.6 U5.7 U5.8 Y1.1 Y1.2
copper on no net: | length 639.6
  F.Cu w0.2: 56.236,29.462 67.797,17.9 78.4,17.9 81.65,21.15 81.65,25.525 ; 56.236,32.462 56.236,31.264 68.9,18.6 78.2,18.6 81.15,21.55 81.15,25.525 ; 56.236,35.462 57.9,33.797 57.9,30.7 69.3,19.3 78.1,19.3 80.65,21.85 80.65,25.525 ; 56.236,38.462 57.338,38.462 63.2,32.6 63.2,26.3 69.7,19.8 77.7,19.8 80.15,22.25 80.15,25.525 ; 56.236,41.462 56.236,40.864 63.9,33.2 63.9,26.5 69.845,20.555 77.755,20.555 79.65,22.45 79.65,25.525 ; v1@66.8,33.6 68.075,33.6 ; v1(67.5,28.7) 68.5,29.7 70.775,29.7 ; v1(67.5,30.3) 68.075,30.875 68.075,31.7 ; v1(69.7,26.7) 70.125,27.125 71.174,27.125 71.199,27.1 72.8,27.1 72.8,27.832 73.918,28.95 74.725,28.95 ; v1(69.8,25.4) 71.174,25.4 71.199,25.375 72.8,25.375 ; 69.8,31.7 71.85,31.7 71.9,31.75 72.6,32.45 74.725,32.45 ; 69.8,33.6 71.9,33.6 72.6,32.9 74.675,32.9 74.725,32.95 ; v1(71.9,38.337) 71.925,38.362 73.4,38.362 ; v1(72,36.637) 73.4,36.637 73.4,36.275 74.725,34.95 ; 72.3,29.9 72.5,29.7 ; v1(72.4,28.4) 72.4,29.6 72.5,29.7 ; v1(73.657,23.855) 74.014,23.498 75.1,23.498 75.102,23.5 76.751,23.5 77.65,24.399 77.65,25.525 77.619,25.494 ; v1(73.8,21.4) 74.173,21.773 75.1,21.773 75.102,21.775 76.751,21.775 ; 74.725,29.45 76.25,29.45 v1(76.3,29.5) ; 74.725,31.95 73.918,31.95 73.3,31.332 73.3,30.4 72.6,29.7 72.5,29.7 ; v1(75.125,38.85) 76.525,38.85 76.65,38.725 76.65,36.875 ; v1(75.225,40.55) 75.25,40.575 76.525,40.575 ; v1(77.1,27.2) 77.15,27.15 77.15,25.525 ; v1(77.1,35.2) 77.15,35.25 77.15,36.875 ; 78.65,36.875 78.65,37.75 79.2,38.3 79.2,39 ; 79.2,41 80.6,41 v1(81,41.4) ; v1(83.6,27.1) 83.65,27.05 83.65,25.525 ; 84.15,25.525 84.173,25.502 84.173,23.592 85.783,23.592 v1(85.825,23.55) ; 84.15,36.875 84.15,38.05 v1(84.8,38.7) ; 84.173,21.867 85.708,21.867 v1(85.725,21.85) ; v1(84.3,34.4) 84.35,34.45 86.075,34.45 ; 86.075,32.95 86.882,32.95 88.537,31.295 90.025,31.295 ; 86.075,33.45 86.882,33.45 88.537,35.105 90.025,35.105 ; 86.075,33.95 85.05,33.95 84.4,33.3 84.4,27.3 87.2,24.5 89.72,24.5 91.92,22.3 ; 86.075,34.95 86.56,35.435 86.56,36.246 87.954,36.246 v1(88,36.2) ; v1(86.525,39.25) 86.56,39.215 86.56,37.971 ; v1(88.1,33.6) 88.335,33.835 90.025,33.835 ; v1(88.2,32.7) 89.89,32.7 90.025,32.565 ; v1(88.5,25.5) 88.8,25.8 88.8,27.137 ; 88.8,28.862 90.1,28.862 90.563,28.862 v1(90.6,28.9) ; v1(94,29) 94.038,28.962 95.4,28.962 95.4,30.87 94.975,31.295 ; v1(94.1,27.3) 94.162,27.237 95.4,27.237 ; 94.975,32.565 96.438,32.565 96.847,32.975 98.7,32.975 99.975,31.7 101.1,31.7 ; 94.975,33.835 96.438,33.835 96.847,33.425 98.7,33.425 99.975,34.7 101.1,34.7 ; 94.975,35.105 94.975,35.975 v1(95.6,36.6)
  F.Cu w0.5: 91.45,48.502 93.432,48.502 93.512,48.582 ; 91.45,49.152 91.45,50.15 v1(91.6,50.3)
  F.Cu w0.65: 56.236,47.462 66.937,47.462 67.565,48.09 ; v1(71.272,57.938) 71.28,57.93 71.28,55.79 ; 71.28,51.79 71.28,48.825 72.015,48.09 72.26,48.09 73.9,46.45 74.75,47.3 74.75,48.06 74.75,49.01 ; 73.9,44.725 75.443,44.725 v1(75.463,44.704) ; v1(74.6,51.8) 74.6,50.11 74.75,49.96 ; v1(77,46.8) 77.025,46.825 77.025,48.06 ; 77.025,49.01 79.193,49.01 79.087,49.115 79.087,51.602 ; 77.025,49.96 77.025,51.265 77.362,51.602 ; v1(78.486,44.679) 78.507,44.7 79.9,44.7 81.95,44.7 81.97,44.72 ; 79.9,46.425 81.95,46.425 81.97,46.445 82.167,46.642 82.167,49.01 ; v1(82.1,51.2) 82.167,51.132 82.167,49.01 ; v1(84.099,50.165) 83.693,49.759 83.693,48.792 ; 85.065,47.067 85.065,45.67 v1(85.09,45.644) ; 87.198,46.965 87.198,46.076 v1(87.935,45.339) ; 87.224,49.429 87.224,49.911 86.741,50.394 ; v1(87.503,50.927) 87.274,50.927 86.741,50.394 ; 91.465,47.549 91.45,47.533 91.45,47.202 91.777,46.874 93.355,46.874 94.931,46.874 95.237,47.181 ; 93.355,45.149 94.653,45.149 v1(94.666,45.162) ; 95.237,48.582 95.237,47.181 ; v1(96.5,46.5) 95.918,46.5 95.237,47.181 ; 82.167,49.01 82.386,48.792 83.693,48.792 ; 83.693,48.792 85.065,48.792 85.065,49.734 85.725,50.394 86.741,50.394
  B.Cu w0.2: v1(72.4,28.4) 83.28,28.4 89.38,22.3 ; v1(84.8,38.7) 84.8,38.551 93.31,30.041 93.31,25.99 97,22.3 ; v1(88.2,32.7) 88.2,31.3 v1(90.6,28.9)
  B.Cu w0.65: v1(74.6,51.8) 74.7,51.9 81.4,51.9 v1(82.1,51.2) ; v1(87.503,50.927) 87.681,50.927 88.138,50.47 88.138,45.543 v1(87.935,45.339)
  Edge.Cuts w0.254: 48,24.7 ccw(c58,24.7) 58,14.7 98,14.7 ccw(c98,24.7) 108,24.7 108,37.7 ccw(c104,37.7) 104,41.7 102,41.7 cw(c102,45.7) 98,45.7 98,54.95 ccw(c94,54.95) 94,58.95 58,58.95 ccw(c58,48.95) 48,48.95 48,24.7
  other v1: 66.6,33.8

## Polygon pours and split planes (outlines as drawn)
no net on In1.Cu "In1.Cu-" (solid, remove dead copper, pour order 0): 43,70.2 143.5,67.2 139.9,0 27.2,3.6 44.3,70.7
no net on In2.Cu "In2.Cu--1" (solid, remove dead copper, pour order 1): 132.004,65.431 46.609,64.796 43.688,11.329 125.705,11.862 128.956,66.269
no net on In2.Cu "In2.Cu-" (solid, remove dead copper, pour order 2): 83.1,50.3 84.2,51.9 88.4,52.2 91.2,47 97.1,37.3 92.266,32.682 91.413,26.225 86.2,26.2 86.1,30.5 89.5,35.9 84.2,45.5 83.2,50.3

## Other copper
F.SilkS:
  text "+12V" at 50.2,46.416 h1
  text "GND" at 51.2,43.415 h1
  text "AIN 1" at 50.2,40.621 h1
  text "CANH" at 99,37.815 h1
  text "AIN 2" at 50.2,37.62 h1
  text "AIN 3" at 50.2,34.615 h1
  text "AIN 4" at 50.2,31.62 h1
  text "AIN 5" at 50,28.616 h1
  text "CANL" at 99.2,26.015 h1
  text "GND" at 95.485,17.3 h1 r90
  text "3.3V" at 100.685,17 h1 r90
  text "NRST" at 90.185,16.5 h1 r90
  text "SWDIO" at 92.685,15.7 h1 r90
  text "SWCLK" at 98.085,15.4 h1 r90
  text "FSAE Analog to CAN Converter Rev 1." at 57.75,15.317 h1